# Altium PCB PCB1.PcbDoc (part 3 of 3)
Units mm, origin at the board's own origin, x right, y up, seen from the top; angles counter-clockwise.
Board outline 82.55 x 101.6 mm, 4 copper layers (Top Layer, GND, POWER, Bottom Layer), stack 1.586 mm thick; 125 components, 82 nets, 451 pads, 255 vias.
Unrouted connection lines stored in the file: 4.
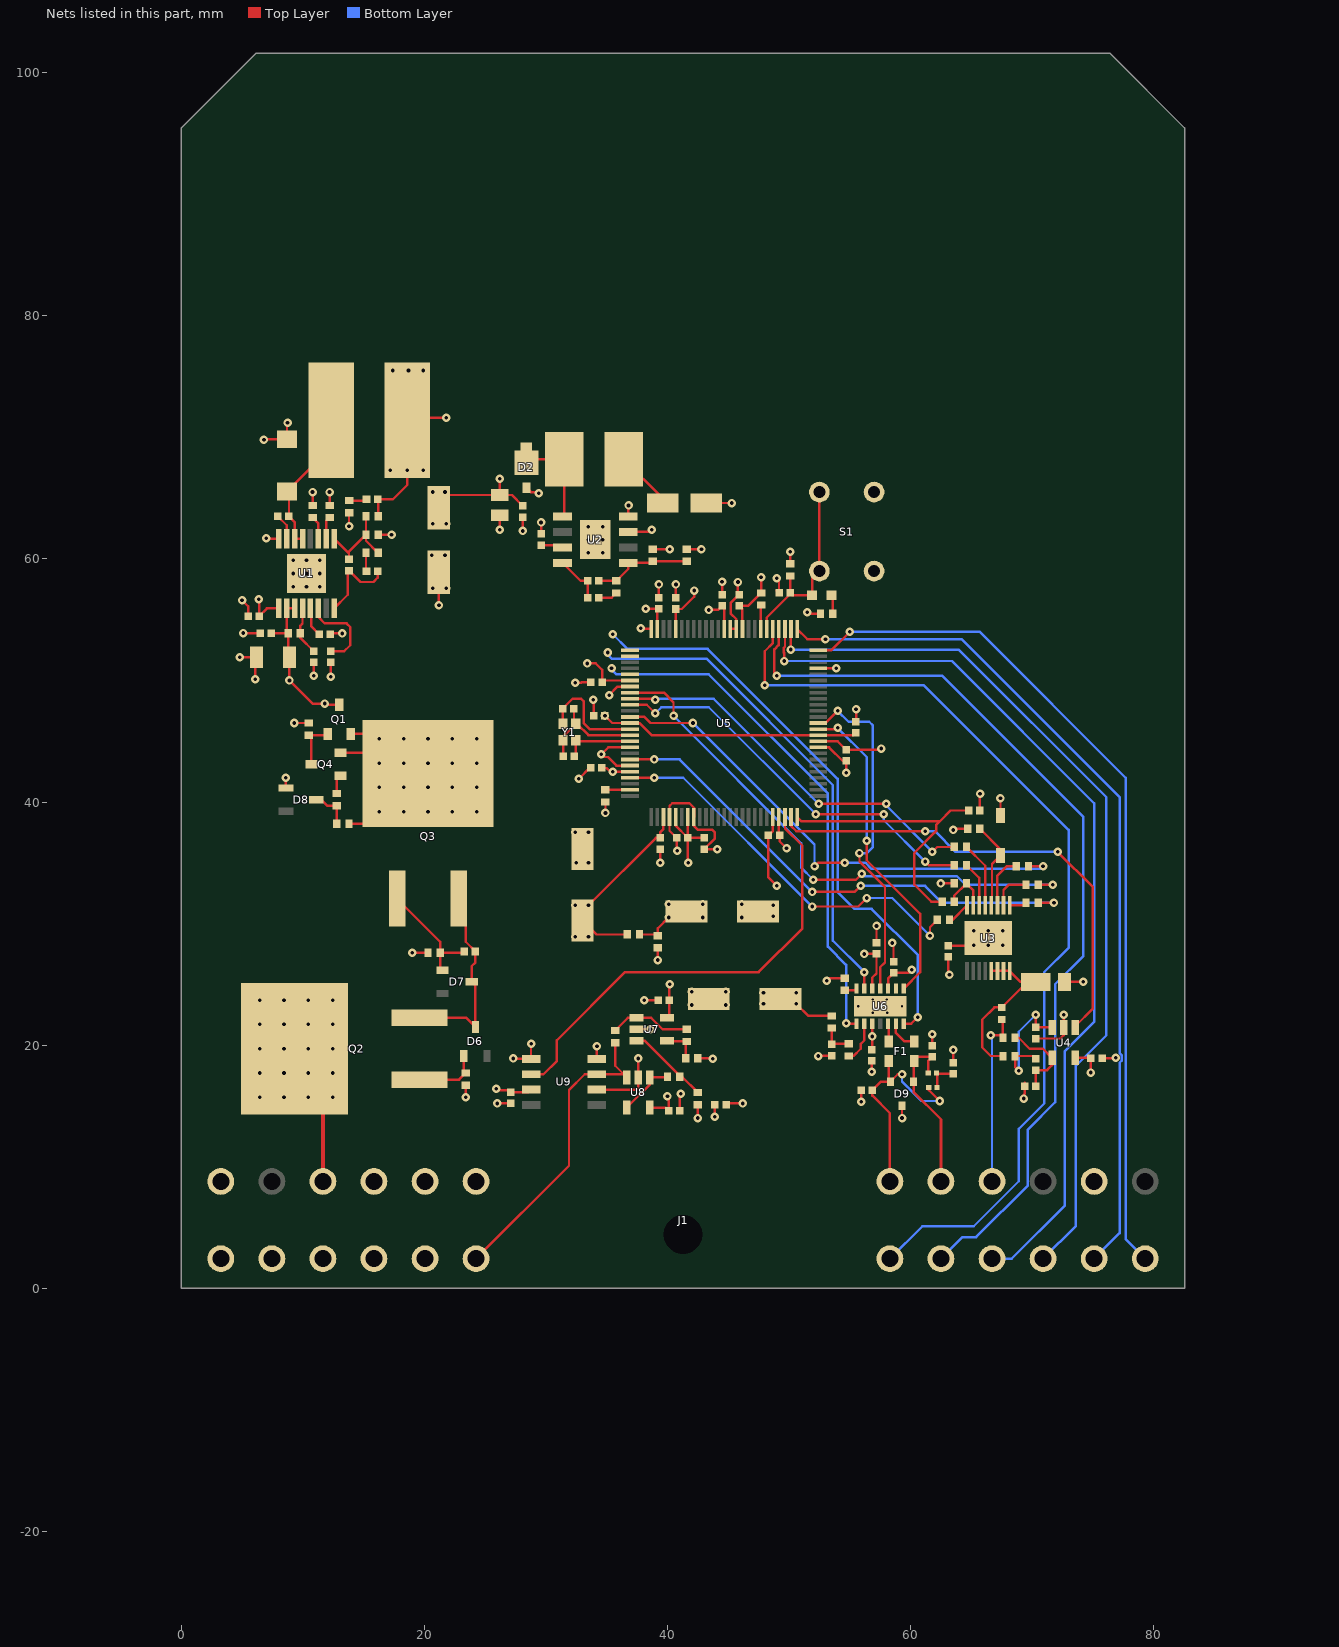
[diagram p4: the nets of this part, all layers, seen from the top]

## Part data (continued)
R31 R32: library part RK73H1HRTTCM60R4F, "Fixed Resistor, Metal Glaze/thick Film, 0.05W, 60.4ohm, 25V, 1% +/-Tol, 300ppm/Cel, Surface Mount, 0201", Manufacturer="KOA Speer", Supplier Part Number=660-RK73H1HRTTCM60R4, Category=LDO, Manufacturer Part Number=RK73H1HRTTCM60R4F, Pricing="1=0.16, 10=0.079, 50=0.079, 100=0.046, 1000=0.028, 10000=0.02 (USD)", Reach SVHC Compliant=Yes, RoHS=Yes, RoHS Compliant=Yes, Stock=38859, Supplier=Mouser
R33: library part AC0402FR-076K2L, "Fixed Resistor, Metal Glaze/thick Film, 0.0625W, 6200ohm, 50V, 1% +/-Tol, 100ppm/Cel, Surface Mount, 0402", Case/Package=0402, Manufacturer=Yageo, Max Operating Temperature=155°C, Min Operating Temperature=-55°C, Package Height=0.32mm, Package Length=1mm, Package Shape=Rectangular, Package Width=0.5mm, Power=62.5mW, Rated Temperature=70°C, Resistor Type="FIXED RESISTOR", Supplier Part Number=603-AC0402FR-076K2L, Temperature Coefficient (ppm/Cel)=100, Tolerance=1%, Working Voltage=50V, Additional Feature="LASER TRIMMABLE", Category="Chip SMD Resistors", ComponentLink1Description=https://datasheet.ciiva.com:443/pdfs/VipMasterIC/IC/YAGO/YAGO-S-A0003597364/YAGO-S-A0003597364-1.pdf?src-supplier=IHS+Markit, ComponentLink1URL=https://datasheet.ciiva.com:443/pdfs/VipMasterIC/IC/YAGO/YAGO-S-A0003597364/YAGO-S-A0003597364-1.pdf?src-supplier=IHS+Markit, ComponentLink2Description=https://datasheet.octopart.com/AC0402FR-076K2L-Yageo-datasheet-151884373.pdf?src-supplier=Future+Electronics, ComponentLink2URL=https://datasheet.octopart.com/AC0402FR-076K2L-Yageo-datasheet-151884373.pdf?src-supplier=Future+Electronics, ComponentLink3Description=http://www.yageo.com/NewPortal/yageodocoutput?fileName=/pdf/R-Chip/PYu-AC_51_RoHS_L_6.pdf&src-supplier=Digikey, ComponentLink3URL=http://www.yageo.com/NewPortal/yageodocoutput?fileName=/pdf/R-Chip/PYu-AC_51_RoHS_L_6.pdf&src-supplier=Digikey, ComponentLink4Description=https://www.yageo.com/upload/media/product/productsearch/datasheet/rchip/PYu-AC_51_RoHS_L_7.pdf?src-supplier=Digikey, ComponentLink4URL=https://www.yageo.com/upload/media/product/productsearch/datasheet/rchip/PYu-AC_51_RoHS_L_7.pdf?src-supplier=Digikey, ComponentLink5Description=http://www.yageo.com/documents/recent/PYu-AC_51_RoHS_L_2_revised.pdf?src-supplier=Future+Electronics, ComponentLink5URL=http://www.yageo.com/documents/recent/PYu-AC_51_RoHS_L_2_revised.pdf?src-supplier=Future+Electronics, Construction=Chip, JESD-609 Code=e3, Manufacturer Part Number=AC0402FR-076K2L, Mounting Technology="Surface Mount", Packaging="Tape and Reel", Pins=2, Pricing="1=0.1, 10=0.009, 50=0.009, 100=0.007, 1000=0.006, 10000=0.002 (USD)", Reach SVHC Compliant=Yes, Reference Standard=AEC-Q200, RoHS=Yes, RoHS Compliant=Yes, Stock=418682, Supplier=Mouser, Technology="METAL GLAZE/THICK FILM", Terminal Finish=Nickel, Termination=Wraparound
R34: library part RC0402JR-072KP, "Fixed Resistor, Metal Glaze/thick Film, 0.0625W, 2000ohm, 50V, 5% +/-Tol, 150ppm/Cel, Surface Mount, 0402", Manufacturer=Yageo, Supplier Part Number=603-RC0402JR-072KP, Category=Uncategorized, Manufacturer Part Number=RC0402JR-072KP, Pricing="1=0.2, 10=0.02, 50=0.02, 100=0.013, 1000=0.011, 10000=0.005 (USD)", RoHS=Yes, Stock=28128, Supplier=Mouser
R36 R37: library part AC0402FR-1010RL, "Fixed Resistor, Metal Glaze/thick Film, 0.0625W, 10ohm, 50V, 1% +/-Tol, 200ppm/Cel, Surface Mount, 0402", Case/Package=0402, Manufacturer=Yageo, Max Operating Temperature=155°C, Min Operating Temperature=-55°C, Package Height=0.32mm, Package Length=1mm, Package Shape=Rectangular, Package Width=0.5mm, Power=62.5mW, Rated Temperature=70°C, Resistor Type="FIXED RESISTOR", Supplier Part Number=603-AC0402FR-1010RL, Temperature Coefficient (ppm/Cel)=200, Tolerance=1%, Working Voltage=50V, Additional Feature="LASER TRIMMABLE", Category="Chip SMD Resistors", ComponentLink1Description=https://datasheet.ciiva.com:443/pdfs/VipMasterIC/IC/YAGO/YAGO-S-A0003597364/YAGO-S-A0003597364-1.pdf?src-supplier=IHS+Markit, ComponentLink1URL=https://datasheet.ciiva.com:443/pdfs/VipMasterIC/IC/YAGO/YAGO-S-A0003597364/YAGO-S-A0003597364-1.pdf?src-supplier=IHS+Markit, Construction=Chip, JESD-609 Code=e3, Manufacturer Part Number=AC0402FR-1010RL, Mounting Technology="Surface Mount", Packaging="Tape and Reel", Pins=2, Pricing="1=0.18, 10=0.018, 50=0.018, 100=0.012, 1000=0.01, 10000=0.005 (USD)", Reach SVHC Compliant=Yes, Reference Standard=AEC-Q200, RoHS=Yes, RoHS Compliant=Yes, Stock=136743, Supplier=Mouser, Technology="METAL GLAZE/THICK FILM", Terminal Finish=Nickel, Termination=Wraparound
S1: "BUTON MINI 6X6X5, 4 PINI", Price="0.36 RON", Supplier=Sigmanortec
U1: library part A7987TR, "Switching Regulator, Voltage-mode, 4.4A, 1650kHz Switching Freq-Max, PDSO16", Manufacturer=STMicroelectronics, Supplier Part Number=511-A7987TR, Category="Voltage Regulators - Switching", ComponentLink1Description=https://www.st.com/resource/en/datasheet/a7987.pdf?src-supplier=Digikey, ComponentLink1URL=https://www.st.com/resource/en/datasheet/a7987.pdf?src-supplier=Digikey, ComponentLink2Description=https://datasheet.octopart.com/A7987TR-STMicroelectronics-datasheet-153441496.pdf?src-supplier=Element14, ComponentLink2URL=https://datasheet.octopart.com/A7987TR-STMicroelectronics-datasheet-153441496.pdf?src-supplier=Element14, Manufacturer Part Number=A7987TR, Pricing="1=5.04, 10=3.84, 50=3.54, 100=3.21, 1000=2.88, 10000=2.58 (USD)", RoHS=Yes, RoHS Compliant=Yes, Stock=4709, Supplier=Mouser
U2: library part A7985ATR, "Switching Regulator, Voltage-mode, 3.5A, 275kHz Switching Freq-Max, PDSO8", Case/Package=HLSOP, Frequency=275kHz, Manufacturer=STMicroelectronics, Max Operating Temperature=125°C, Max Output current=3.5A, Max Supply Voltage=38V, Min Input Voltage=4.5V, Min Operating Temperature=-40°C, Nominal Supply Voltage=12V, Package Body Material=Plastic, Package Equivalence Code=SOP8,.25, Package Shape=Rectangular, Package Style="SMALL OUTLINE, HEAT SINK/SLUG, LOW PROFILEMeter", Supplier Part Number=511-A7985ATR, Temperature Grade=AUTOMOTIVE, Category="Voltage Regulators - Switching", Channels=1, ComponentLink1Description=https://datasheet.ciiva.com:443/pdfs/VipMasterIC/IC/SGST/SGST-S-A0002908266/SGST-S-A0002908266-1.pdf?src-supplier=IHS+Markit, ComponentLink1URL=https://datasheet.ciiva.com:443/pdfs/VipMasterIC/IC/SGST/SGST-S-A0002908266/SGST-S-A0002908266-1.pdf?src-supplier=IHS+Markit, ComponentLink2Description=https://datasheet.ciiva.com/41458/001184805-da-01-en-ic-reg-buck-adj-2a-a7985atr-soic-8-stm-41458161.pdf?src-supplier=Conrad, ComponentLink2URL=https://datasheet.ciiva.com/41458/001184805-da-01-en-ic-reg-buck-adj-2a-a7985atr-soic-8-stm-41458161.pdf?src-supplier=Conrad, ComponentLink3Description=https://datasheet.ciiva.com/6603/dm00053375-6603398.pdf?src-supplier=Digikey, ComponentLink3URL=https://datasheet.ciiva.com/6603/dm00053375-6603398.pdf?src-supplier=Digikey, ComponentLink4Description=https://datasheet.ciiva.com/6603/dm00053375-6603399.pdf?src-supplier=Digikey, ComponentLink4URL=https://datasheet.ciiva.com/6603/dm00053375-6603399.pdf?src-supplier=Digikey, ComponentLink5Description=https://datasheet.ciiva.com/6603/dm00053375-6603401.pdf?src-supplier=Digikey, ComponentLink5URL=https://datasheet.ciiva.com/6603/dm00053375-6603401.pdf?src-supplier=Digikey, Control Mode=VOLTAGE-MODE, Control Technique="PULSE WIDTH MODULATION", Height - Seated (Max)=1.7mm, JESD-30 Code=R-PDSO-G8, JESD-609 Code=e3, Length=4.9mm, Manufacturer Part Number=A7985ATR, Moisture Sensitivity Level=3, Pins=8, Pricing="1=1.76, 10=1.51, 50=1.42, 100=1.34, 1000=1.24, 10000=1.1 (USD)", Qualification Status="Not Qualified", Reach SVHC Compliant=Yes, RoHS=Yes, RoHS Compliant=Yes, Stock=5225, Supplier=Mouser, Surface Mount=Yes, Switcher Configuration=BUCK, Terminal Finish=Tin, Terminal Form="Gull Wing", Terminal Pitch=1.27mm, Terminal Position=DUAL, Throw Configuration="SWITCHING REGULATOR", Width=3.9mm
U3: library part VND7020AJTR, "Buffer/Inverter Based Peripheral Driver, PDSO16", Case/Package=HLSSOP, Manufacturer=STMicroelectronics, Max Operating Temperature=125°C, Max Supply Voltage=28V, Min Operating Temperature=-40°C, Min Supply Voltage=4V, Nominal Supply Voltage=13V, Output Current Flow Direction=SINK, Package Body Material=Plastic, Package Shape=Rectangular, Package Style="SMALL OUTLINE, HEAT SINK/SLUG, LOW PROFILE, SHRINK PITCHMeter", Supplier Part Number=511-VND7020AJTR, Temperature Grade=AUTOMOTIVE, Built-in Protections="Over Current,Over Voltage,Under Voltage,TRANSIENT,THERMAL", Category="Power Management ICs", Channels=1, ComponentLink1Description=https://datasheet.ciiva.com:443/pdfs/VipMasterIC/IC/SGST/SGST-S-A0003587758/SGST-S-A0003587758-1.pdf?src-supplier=IHS+Markit, ComponentLink1URL=https://datasheet.ciiva.com:443/pdfs/VipMasterIC/IC/SGST/SGST-S-A0003587758/SGST-S-A0003587758-1.pdf?src-supplier=IHS+Markit, ComponentLink2Description=http://www.st.com/content/ccc/resource/technical/document/datasheet/53/f9/e8/69/7d/b8/4a/10/DM00157075.pdf/files/DM00157075.pdf/jcr:content/translations/en.DM00157075.pdf?src-supplier=Digikey, ComponentLink2URL=http://www.st.com/content/ccc/resource/technical/document/datasheet/53/f9/e8/69/7d/b8/4a/10/DM00157075.pdf/files/DM00157075.pdf/jcr:content/translations/en.DM00157075.pdf?src-supplier=Digikey, ComponentLink3Description=http://www.st.com/st-web-ui/static/active/en/resource/technical/document/datasheet/DM00157075.pdf?src-supplier=Avnet, ComponentLink3URL=http://www.st.com/st-web-ui/static/active/en/resource/technical/document/datasheet/DM00157075.pdf?src-supplier=Avnet, ComponentLink4Description=https://datasheet.octopart.com/VND7020AJTR-STMicroelectronics-datasheet-42731139.pdf?src-supplier=Future+Electronics, ComponentLink4URL=https://datasheet.octopart.com/VND7020AJTR-STMicroelectronics-datasheet-42731139.pdf?src-supplier=Future+Electronics, ComponentLink5Description=https://datasheet.octopart.com/VND7020AJTR-STMicroelectronics-datasheet-158447462.pdf?src-supplier=SHENGYU+ELECTRONICS, ComponentLink5URL=https://datasheet.octopart.com/VND7020AJTR-STMicroelectronics-datasheet-158447462.pdf?src-supplier=SHENGYU+ELECTRONICS, ComponentLink6Description=https://datasheet.octopart.com/VND7020AJTR-STMicroelectronics-datasheet-140368810.pdf?src-supplier=TME, ComponentLink6URL=https://datasheet.octopart.com/VND7020AJTR-STMicroelectronics-datasheet-140368810.pdf?src-supplier=TME, Height - Seated (Max)=1.7mm, Interface IC Type="BUFFER OR INVERTER BASED PERIPHERAL DRIVER", JESD-30 Code=R-PDSO-G16, Length=4.9mm, Manufacturer Part Number=VND7020AJTR, Pins=16, Pricing="1=2.79, 10=2.05, 50=1.93, 100=1.77, 1000=1.53, 10000=1.41 (USD)", Reach SVHC Compliant=Yes, RoHS=Yes, RoHS Compliant=Yes, Stock=132353, Supplier=Mouser, Surface Mount=Yes, Terminal Form="Gull Wing", Terminal Pitch=0.5mm, Terminal Position=DUAL, Turn-Off Delay Time=100us, Turn-On Delay Time=120us, Width=3.9mm
U4: library part INA193AQDBVRQ1, "Operational Amplifier, 1 Func, PDSO5", Case/Package=LSSOP, Manufacturer="Texas Instruments", Max Operating Temperature=125°C, Max Supply Voltage=18V, Min Operating Temperature=-40°C, Min Supply Voltage=2.7V, Nominal Supply Voltage=12V, Package Body Material=Plastic, Package Equivalence Code=TSOP5/6,.11,37, Package Shape=Rectangular, Package Style="SMALL OUTLINE, LOW PROFILE, SHRINK PITCHMeter", Peak Reflow Temperature (Cel)=260°C, Supplier Part Number=595-INA193AQDBVRQ1, Supply Current-Max (Isup)=1.25mA, Temperature Grade=AUTOMOTIVE, Adjustable Threshold=No, Category="Amplifiers - Op Amps, Buffer, Instrumentation", Channels=1, ComponentLink1Description=https://www.ti.com:443/lit/ds/symlink/ina193a-q1.pdf?src-supplier=IHS+Markit, ComponentLink1URL=https://www.ti.com:443/lit/ds/symlink/ina193a-q1.pdf?src-supplier=IHS+Markit, ComponentLink2Description=https://datasheet.ciiva.com/1939/ina193a-q1-1939597.pdf?src-supplier=Digikey, ComponentLink2URL=https://datasheet.ciiva.com/1939/ina193a-q1-1939597.pdf?src-supplier=Digikey, ComponentLink3Description=https://datasheet.ciiva.com/1577/1383809-1577443.pdf?src-supplier=Newark, ComponentLink3URL=https://datasheet.ciiva.com/1577/1383809-1577443.pdf?src-supplier=Newark, ComponentLink4Description=https://datasheet.ciiva.com/4875/sbos366c-126160-4875330.pdf?src-supplier=Mouser, ComponentLink4URL=https://datasheet.ciiva.com/4875/sbos366c-126160-4875330.pdf?src-supplier=Mouser, ComponentLink5Description=https://datasheet.ciiva.com/15134/getdatasheetpartid-255678-15134586.pdf?src-supplier=Verical, ComponentLink5URL=https://datasheet.ciiva.com/15134/getdatasheetpartid-255678-15134586.pdf?src-supplier=Verical, ComponentLink6Description=https://datasheet.ciiva.com/2977/ina198a-q1-2977933.pdf?src-supplier=Avnet, ComponentLink6URL=https://datasheet.ciiva.com/2977/ina198a-q1-2977933.pdf?src-supplier=Avnet, ComponentLink7Description=https://datasheet.ciiva.com/2977/ina198a-q1-2977934.pdf?src-supplier=Avnet, ComponentLink7URL=https://datasheet.ciiva.com/2977/ina198a-q1-2977934.pdf?src-supplier=Avnet, Height - Seated (Max)=1.45mm, JESD-30 Code=R-PDSO-G5, JESD-609 Code=e4, Length=2.9mm, Manufacturer Part Number=INA193AQDBVRQ1, Moisture Sensitivity Level=2, Number of Channels=1, Pins=5, Power Supplies=12V, Pricing="1=4.07, 10=3.08, 50=2.83, 100=2.56, 1000=2.29, 10000=2.18 (USD)", Qualification Status="Not Qualified", Reach SVHC Compliant=Yes, RoHS=Yes, RoHS Compliant=Yes, Stock=19974, Supplier=Mouser, Surface Mount=Yes, Terminal Finish=Nickel, Terminal Form="Gull Wing", Terminal Pitch=0.95mm, Terminal Position=DUAL, Throw Configuration="POWER SUPPLY SUPPORT CIRCUIT", Width=1.6mm
U5: library part TMS5700332BPZQQ1, "RISC Microcontroller, 32-Bit, FLASH, CORTEX-R4F CPU, 80MHz, CMOS, PQFP100", Manufacturer="Texas Instruments", Supplier Part Number=595-TMS5700332BPZQQ1, Category=Microcontrollers, ComponentLink1Description=https://www.ti.com:443/lit/ds/symlink/tms570ls0332.pdf?src-supplier=IHS+Markit, ComponentLink1URL=https://www.ti.com:443/lit/ds/symlink/tms570ls0332.pdf?src-supplier=IHS+Markit, ComponentLink2Description=https://www.ti.com/lit/ds/symlink/tms570ls0332.pdf?src-supplier=Digikey, ComponentLink2URL=https://www.ti.com/lit/ds/symlink/tms570ls0332.pdf?src-supplier=Digikey, ComponentLink3Description=http://www.ti.com/lit/gpn/tms570ls0332?src-supplier=Mouser, ComponentLink3URL=http://www.ti.com/lit/gpn/tms570ls0332?src-supplier=Mouser, ComponentLink4Description=http://www.ti.com/general/docs/lit/getliterature.tsp?genericPartNumber=TMS570LS0332&&fileType=pdf&src-supplier=Avnet, ComponentLink4URL=http://www.ti.com/general/docs/lit/getliterature.tsp?genericPartNumber=TMS570LS0332&&fileType=pdf&src-supplier=Avnet, JESD-609 Code=e4, Manufacturer Part Number=TMS5700332BPZQQ1, Moisture Sensitivity Level=3, Pricing="1=12.28, 10=9.98, 50=9.52, 100=8.26, 1000=7.2, 10000=6.27 (USD)", Reach SVHC Compliant=Yes, RoHS=Yes, RoHS Compliant=Yes, Stock=411, Supplier=Mouser, Technology=CMOS, Terminal Finish=Nickel
U6: library part TCAN1043DMTRQ1, "Ethernet Transceiver, 1-Trnsvr, PDSO14", Manufacturer="Texas Instruments", Supplier Part Number=595-TCAN1043DMTRQ1, Category="Interface ICs", ComponentLink1Description=https://www.ti.com:443/lit/ds/symlink/tcan1043-q1.pdf?src-supplier=IHS+Markit, ComponentLink1URL=https://www.ti.com:443/lit/ds/symlink/tcan1043-q1.pdf?src-supplier=IHS+Markit, ComponentLink2Description=http://www.ti.com/lit/ds/symlink/tcan1043-q1.pdf?src-supplier=Digikey, ComponentLink2URL=http://www.ti.com/lit/ds/symlink/tcan1043-q1.pdf?src-supplier=Digikey, JESD-609 Code=e3, Manufacturer Part Number=TCAN1043DMTRQ1, Moisture Sensitivity Level=2, Pricing="1=2.47, 10=1.84, 50=1.68, 100=1.51, 1000=1.33, 10000=1.16 (USD)", Reach SVHC Compliant=Yes, RoHS=Yes, RoHS Compliant=Yes, Stock=28707, Supplier=Mouser, Telecom IC Type="ETHERNET TRANSCEIVER", Terminal Finish=Tin
U7 U8: library part AD8538AUJZ-REEL7, "Operational Amplifier, 1 Func, 30uV Offset-Max, CMOS, PDSO5", Average Bias Current-Max (IIB)=100pA, Bias Current-Max (IIB) @25C=25pA, Case/Package=VSSOP, Frequency Compensation=YES, Input Offset Voltage-Max=30uV, Manufacturer="Analog Devices", Max Operating Temperature=125°C, Max Supply Current=215uA, Micropower=Yes, Min Operating Temperature=-40°C, Neg Supply Voltage Limit-Max=0V, Nominal Supply Voltage=5V, Package Body Material=Plastic, Package Equivalence Code=TSOP5/6,.11,37, Package Shape=Rectangular, Package Style="SMALL OUTLINE, VERY THIN PROFILE, SHRINK PITCHMeter", Peak Reflow Temperature (Cel)=260°C, Power=No, Power Supplies=+-1.35/+-2.5/2.7/5V, Supplier Part Number=584-AD8538AUJZ-R7, Supply Voltage Limit-Max=6V, Temperature Grade=AUTOMOTIVE, Time @ Peak Reflow Temperature-Max (s)=40s, Voltage Gain-Min=178000, Amplifier Type="OPERATIONAL AMPLIFIER", Architecture=VOLTAGE-FEEDBACK, Category="Amplifiers - Op Amps, Buffer, Instrumentation", Channels=1, Common-mode Reject Ratio-Nom=135dB, ComponentLink1Description=https://datasheet.ciiva.com:443/pdfs/VipMasterIC/IC/ANDI/ANDIS13894/ANDIS13894-1.pdf?src-supplier=IHS+Markit, ComponentLink1URL=https://datasheet.ciiva.com:443/pdfs/VipMasterIC/IC/ANDI/ANDIS13894/ANDIS13894-1.pdf?src-supplier=IHS+Markit, ComponentLink2Description=https://datasheet.ciiva.com/15374/ad8538-8539-243268-15374656.pdf?src-supplier=Mouser, ComponentLink2URL=https://datasheet.ciiva.com/15374/ad8538-8539-243268-15374656.pdf?src-supplier=Mouser, ComponentLink3Description=https://datasheet.ciiva.com/2974/ad8538-8539-2974672.pdf?src-supplier=Avnet, ComponentLink3URL=https://datasheet.ciiva.com/2974/ad8538-8539-2974672.pdf?src-supplier=Avnet, ComponentLink4Description=https://datasheet.ciiva.com/1793/ad8538-8539-1793940.pdf?src-supplier=Digikey, ComponentLink4URL=https://datasheet.ciiva.com/1793/ad8538-8539-1793940.pdf?src-supplier=Digikey, ComponentLink5Description=https://datasheet.ciiva.com/1793/ad8538-8539-1793941.pdf?src-supplier=Digikey, ComponentLink5URL=https://datasheet.ciiva.com/1793/ad8538-8539-1793941.pdf?src-supplier=Digikey, ComponentLink6Description=https://datasheet.ciiva.com/1793/ad8538-8539-1793942.pdf?src-supplier=Digikey, ComponentLink6URL=https://datasheet.ciiva.com/1793/ad8538-8539-1793942.pdf?src-supplier=Digikey, ComponentLink7Description=https://datasheet.ciiva.com/2973/ad8538-8539-2973062.pdf?src-supplier=Avnet, ComponentLink7URL=https://datasheet.ciiva.com/2973/ad8538-8539-2973062.pdf?src-supplier=Avnet, Height - Seated (Max)=1mm, JESD-30 Code=R-PDSO-G5, JESD-609 Code=e3, Length=2.9mm, Low-Bias=Yes, Low-Offset=Yes, Manufacturer Part Number=AD8538AUJZ-REEL7, Moisture Sensitivity Level=1, Neg Supply Voltage-Nom (Vsup)=0V, Packaging="Tape and Reel", Pins=5, Pricing="1=1.65, 10=1.42, 50=1.42, 100=1.25, 1000=0.916, 10000=0.84 (USD)", Programmable Power=No, Qualification Status="Not Qualified", Reach SVHC Compliant=Yes, RoHS=Yes, RoHS Compliant=Yes, Slew Rate=0.4V/µs, Stock=130448, Supplier=Mouser, Surface Mount=Yes, Technology=CMOS, Terminal Finish=Tin, Terminal Form="Gull Wing", Terminal Pitch=0.95mm, Terminal Position=DUAL, Unity Gain BW-Nom=430kHz, Wideband=No, Width=1.6mm
U9: library part MAX4194ESA+, "Instrumentation Amplifier, 1 Func, 690uV Offset-Max, 0.25MHz Band Width, PDSO8", Average Bias Current-Max (IIB)=20nA, Case/Package=SOP, Input Offset Current-Max (IIO)=3nA, Input Offset Voltage-Max=690uV, Manufacturer=Maxim, Max Operating Temperature=85°C, Max Supply Current=110uA, Min Operating Temperature=-40°C, Nominal Supply Voltage=5V, Package Body Material=Plastic, Package Equivalence Code=SOP8,.25, Package Shape=Rectangular, Package Style="SMALL OUTLINEMeter", Peak Reflow Temperature (Cel)=260°C, Power Supplies=+-1.35/+-3.75/2.7/7.5V, Supplier Part Number=700-MAX4194ESA, Supply Voltage Limit-Max=8V, Temperature Grade=INDUSTRIAL, Time @ Peak Reflow Temperature-Max (s)=30s, Voltage Gain-Max=10000, Voltage Gain-Min=1, Amplifier Type="INSTRUMENTATION AMPLIFIER", Bandwidth (3dB)-Nom=250kHz, Category="Amplifiers - Op Amps, Buffer, Instrumentation", Channels=1, Common Mode Rejection Ratio-Min=73dB, ComponentLink1Description=https://datasheet.ciiva.com:443/pdfs/VipMasterIC/IC/MAXM/MAXMS15090/MAXMS15090-1.pdf?src-supplier=IHS+Markit, ComponentLink1URL=https://datasheet.ciiva.com:443/pdfs/VipMasterIC/IC/MAXM/MAXMS15090/MAXMS15090-1.pdf?src-supplier=IHS+Markit, ComponentLink2Description=https://datasheet.ciiva.com/2975/max4194-max4197-2975858.pdf?src-supplier=Avnet, ComponentLink2URL=https://datasheet.ciiva.com/2975/max4194-max4197-2975858.pdf?src-supplier=Avnet, ComponentLink3Description=https://datasheet.ciiva.com/14338/max4194-max4197-14338475.pdf?src-supplier=Avnet, ComponentLink3URL=https://datasheet.ciiva.com/14338/max4194-max4197-14338475.pdf?src-supplier=Avnet, ComponentLink4Description=https://datasheet.ciiva.com/1802/max4194-max4197-1802609.pdf?src-supplier=Digikey, ComponentLink4URL=https://datasheet.ciiva.com/1802/max4194-max4197-1802609.pdf?src-supplier=Digikey, ComponentLink5Description=https://datasheet.ciiva.com/1819/max4194-max4197-1819822.pdf?src-supplier=Digikey, ComponentLink5URL=https://datasheet.ciiva.com/1819/max4194-max4197-1819822.pdf?src-supplier=Digikey, Height - Seated (Max)=1.75mm, JESD-30 Code=R-PDSO-G8, JESD-609 Code=e3, Length=4.9mm, Manufacturer Part Number=MAX4194ESA+, Moisture Sensitivity Level=1, Pins=8, Pricing="1=7.06, 10=5.31, 50=5.17, 100=4.65, 1000=3.83, 10000=3.83 (USD)", Qualification Status="Not Qualified", Reach SVHC Compliant=Yes, RoHS=Yes, RoHS Compliant=Yes, Slew Rate=0.06V/µs, Stock=2146, Supplier=Mouser, Surface Mount=Yes, Terminal Finish=Tin, Terminal Form="Gull Wing", Terminal Pitch=1.27mm, Terminal Position=DUAL, Width=3.9mm
Y1: library part ECS-160-10-37B2-CTN-TR, "Crystal 16MHz 10pF 4-Pin SMD ECX-1637B2 T/R", Manufacturer="ECS International", Supplier Part Number=520-160-10-37B2CTNTR, ComponentLink1Description=https://datasheet.octopart.com/ECS-160-10-37B2-CTN-TR-ECS-International-datasheet-163707945.pdf?src-supplier=Master+Electronics, ComponentLink1URL=https://datasheet.octopart.com/ECS-160-10-37B2-CTN-TR-ECS-International-datasheet-163707945.pdf?src-supplier=Master+Electronics, Manufacturer Part Number=ECS-160-10-37B2-CTN-TR, Pricing="1=0.28, 10=0.238, 50=0.238, 100=0.232, 1000=0.213, 10000=0.169 (USD)", RoHS=No, Stock=8732, Supplier=Mouser

## Via types
v1: diameter 0.7, hole 0.3, Top Layer to Bottom Layer, tented top, 188 vias
v2: diameter 0.7, hole 0.3, Top Layer to Bottom Layer, 61 vias
v3: diameter 0.5, hole 0.2, Top Layer to Bottom Layer, 6 vias

## Nets (pads, with @x,y where several pads share a name; then routed paths per layer and width w, separated by ;. In a path a pad name is that pad's centre, name@x,y a point inside that pad or via, vN(x,y) a via of type N, cw(c..) or ccw(c..) an arc to the next point about the centre after c; other vN are vias at no path point)
1V2: C22.2 C23.2 C27.1 C30.2 C31.2 C33.2 C44.2 C47.2 R25.1 R26.2 U5.13 U5.21 U5.30 U5.32 U5.61 U5.88 U5.99 | length 40.7
  Top Layer w0.2: C33.2@34.6,42.8 35,42.8 35.301,42.499 35.499,42.499 v1(35.5,42.5) 35.501,42.499 U5.21@36.932,42.499 ; v1(34.86,47.1) 35.461,46.499 U5.13@36.932,46.499 37.701,46.499 38.701,45.499 U5.61@52.408,45.499 55.299,45.499 C31.2@55.5,45.7 ; R25.1@37.7,29.1 39.1,29.1 R26.2@39.2,29 39.2,29.6 v1(40.1,30.5) ; v1(38.2,55.9) C23.2@39.3,55.9 39.17,55.77 U5.99@39.17,54.237 ; U5.30@40.67,38.761 40.67,38.056 C44.2@41.67,37.056 ; U5.32@41.67,38.761 C44.2@41.67,37.056 ; v1@41.681,34.8 C44.2@41.681,37.045 ; C47.2@43.028,37.045 C44.2@41.681,37.045 ; v1(43.4,55.8) 44.16,55.8 C22.2@44.5,56.14 44.67,55.97 U5.88@44.67,54.237 ; C44.2@41.67,37.056 C44.2@41.681,37.045
  other v1: 42.9,30.5 40.1,31.6 42.9,31.6 41.7,35
3V3: C21.2 C24.2 C25.1 C26.2 C29.2 C32.2 C37.2 C40.2 C41.2 C49.2 C50.2 C51.2 C52.2 R8.2 R23.2 R24.2 R25.2 R27.2 R40.2 U4.5 U5.6 U5.28 U5.46 U5.60 U5.85 U5.96 U6.5 U7.5 U8.5 U9.7 | length 62.4
  Top Layer w0.2: v1(25.9,16.4) 26,16.3 26.92,16.3 C52.2@27.1,16.12 28.566,16.12 U9.7@28.776,16.33 ; v1(33.4,51.4) 34.1,51.4 34.62,50.88 C29.2@34.62,49.846 34.773,49.999 U5.6@36.932,49.999 ; v1(33.5,31.5) 39.045,37.045 C40.2@39.395,37.045 39.395,37.495 39.67,37.77 U5.28@39.67,38.761 ; C25.1@33.675,31.325 33,30.649 C25.1@33,30.25 34.15,29.1 R25.2@36.7,29.1 ; U8.5@38.55,14.85 39.85,14.85 C51.2@40.1,14.6 40.1,15.7 v1(40,15.8) ; R8.2@38.8,60.8 v1(40.2,60.8) ; U7.5@39.95,22.25 40.16,22.46 C49.2@40.16,23.7 40.16,24.96 v1(40.2,25) ; U5.96@40.67,54.237 40.67,55.85 C26.2@40.7,55.88 41.18,55.88 42.2,56.9 v1(42.2,57.4) ; v1(42.5,14) R40.2@42.5,15.1 ; v1(43.9,14.1) C50.2@43.9,15.1 ; U5.85@46.17,54.237 46.17,55.87 C24.2@45.9,56.14 46.64,56.14 R27.2@47.7,57.2 v1(47.7,58.5) ; U5.46@48.67,38.761 48.67,37.612 C41.2@48.305,37.248 48.305,33.795 v1(49,33.1) ; R24.2@50.1,59.6 v1(50.1,60.6) ; v1@51.6,55.5 R23.2@52.6,55.5 ; U5.60@52.408,44.999 54.001,44.999 C32.2@54.7,44.3 57.5,44.3 v1(57.6,44.4) ; v1(56.2,27.5) C37.2@57.2,27.5 57.2,25.9 56.85,25.55 U6.5@56.85,24.65 ; U4.5@73.55,18.95 74.79,18.95 C21.2@74.84,18.9 v1(74.84,17.74)
  other v1: 32.4,28.9 33.5,28.9 32.4,31.5 51.5,55.6
5V: C1.1 C6.1 C7.2 C11.1 C12.2 C46.2 L1.2 R2.2 U1.1 U2.8 U6.3 | length 29.9
  Top Layer w0.2: v1@6.42,56.68 C6.1@6.42,55.3 7.045,55.925 U1.1@8.025,55.925 ; R2.2@16.2,63.5 16.2,64.86 C7.2@16.16,64.9 17.4,64.9 18.6,66.1 L1.2@18.6,71.4 18.8,71.6 v1(21.8,71.6) ; v1(20.7,65.5) 21.2,65 C1.1@21.2,64.2 ; v1(21.7,65.5) 21.94,65.26 C12.2@26.2,65.26 ; v1(26.2,66.6) C12.2@26.2,65.26 ; C11.1@28.1,64.36 27.2,65.26 C12.2@26.2,65.26 ; U2.8@36.789,63.49 36.789,64.389 v1(36.8,64.4) ; U6.3@58.15,24.65 58.15,25.49 C46.2@58.6,25.94 59.84,25.94 v1(60.1,26.2)
  other v1: 6.383,56.695 20.7,62.9 21.8,62.9 17.2,67.3 18.6,67.3 19.9,67.3 17.4,75.5 18.7,75.5 19.9,75.5
12V: C3.2 C4.2 C16.2 C34.2 C39.1 Q1.3 R1.2 R28.2 U1.2 U1.3 U3.17 U6.10 | length 20.5
  Top Layer w0.2: C4.2@7.4,53.9 R1.2@8.8,53.9 ; U1.3@9.325,55.925 U1.2@8.675,55.925 8.675,54.025 R1.2@8.8,53.9 ; Q1.3@13,48 11.9,48 v1(11.8,48.1) 10.8,48.1 v1(8.9,50) C3.2@8.9,51.9 8.8,52 R1.2@8.8,53.9 ; v1(50.6,23.4) 51.6,22.4 R28.2@53.5,22.4 ; C34.2@56.8,19.62 56.85,19.67 U6.10@56.85,21.75 ; C16.2@63.119,28.19 65.19,28.19 v2(65.2,28.2)
  other v1: 56.85,20.71 47.9,23.4 47.9,24.3 50.6,24.3
  other v2: 66.4,28.2 67.6,28.2 65.2,29.4 66.4,29.4 67.6,29.4
ADCIN0: C17.2 R17.1 U5.50 | length 23.6
  Top Layer w0.2: U5.50@50.67,38.761 51.031,38.4 62.4,38.4 ; R17.1@62.6,31.8 61.7,31.8 60.3,33.2 60.3,35.8 62.1,37.6 62.1,38.1 62.4,38.4 ; C17.2@64.78,39.3 63.3,39.3 62.4,38.4
ADCIN1: U4.1 U5.49 | length 39.8
  Top Layer w0.2: U5.49@50.17,38.761 50.17,38.442 50.17,38.03 50.6,37.6 50.9,37.6 v1(61.2,37.6) ; v1(72.1,35.9) 75,33 75,23 73.55,21.55 U4.1@73.55,21.45
  Bottom Layer w0.2: v1(61.2,37.6) 62,37.6 63.7,35.9 v1(72.1,35.9)
ADCIN9: U5.48 U9.6 | length 38
  Top Layer w0.2: U9.6@28.776,17.6 29.8,17.6 30.9,18.7 30.9,20.4 36.5,26 47.5,26 51.1,29.6 51.1,36.4 49.67,37.83 U5.48@49.67,38.761
CAN_N: C53.1 D9.1 F1.3 J1.B1 R32.1 | length 18.7
  Top Layer w0.2: F1.3@58.2,18.7 58.2,17.15 D9.1@58.35,17 ; J1.B1@58.305,8.78 58.305,14.395 56.86,15.84 C53.1@56.86,16.3 57.56,17 D9.1@58.35,17 ; v1(59.3,17.6) 58.95,17.6 D9.1@58.35,17 ; R32.1@61.5,16.5 61.5,16.3 v1(62.4,15.4)
  Bottom Layer w0.2: v1(59.3,17.6) 59.3,17 60.9,15.4 v1(62.4,15.4)
CAN_P: C54.2 D9.2 F1.2 J1.B2 R31.2 | length 14
  Top Layer w0.2: R31.2@61.46,17.7 61.46,18.7 C54.2@61.8,19.04 60.64,19.04 F1.2@60.3,18.7 60.25,18.65 D9.2@60.25,17 60.25,16.15 62.505,13.895
  Top Layer w0.25: J1.B2@62.505,8.78 62.505,13.895
EN: U5.2 U6.6 | length 41
  Top Layer w0.2: U6.6@56.2,24.65 v1(56.2,26)
  Bottom Layer w0.2: v1(35.1,52.3) 35.1,52.1 35.4,51.8 43.2,51.8 53.6,41.4 53.6,28.6 v1(56.2,26)
F\A\U\L\T\: R11.1 U5.8 | length 44.7
  Top Layer w0.2: U5.8@36.932,48.999 39.701,48.999 40.5,48.2 v1(40.5,47.1) ; v1(52,33.6) 55.5,33.6 v1(56,34.1) ; R11.1@70.5,33.2 v1(71.7,33.2)
  Bottom Layer w0.2: v1(40.5,47.1) 51,36.6 51,34.6 v1(52,33.6) ; v1(56,34.1) 56.2,33.9 63.8,33.9 64.5,33.2 v1(71.7,33.2)
GND: C1.2 C3.1 C4.1 C5.1 C6.2 C10.1 C11.2 C12.1 C13.2 C16.1 C17.1 C18.1 C20.2 C21.1 C22.1 C23.1 C24.1 C25.2 C26.1 C27.2 C28.1 C29.1 C30.1 C31.1 C32.1 C33.1 C34.1 C35.2 C36.1 C37.1 C38.2 C39.2 C40.1 C41.1 C42.1 C44.1 C46.1 C47.1 C49.1 C50.1 C51.1 C52.1 C53.2 C54.1 D1.2 D2.1 D3.1 D4.2 D8.1 D9.3 J1.A2 J1.A3 J1.A4 J1.A5 J1.A6 J1.A7 J1.A10 J1.A11 J1.A12 J1.B5 R3.1 R5.1 R6.1 R7.1 R10.1 R18.1 R19.1 R26.1 R29.1 R33.2 R36.1 R37.1 R39.2 R43.1 S1.1 S1.2 U1.16 U1.17 U2.7 U2.9 U4.2 U5.7 U5.17 U5.20 U5.29 U5.33 U5.47 U5.59 U5.72 U5.86 U5.87 U5.100 U6.2 U6.15 U7.2 U8.2 U9.2 U9.4 U9.5 | length 122.5
  Top Layer w0.2: v1(4.8,51.9) C3.1@6.18,51.9 6.1,51.82 v1(6.1,50.1) ; v1(5,56.6) 5.5,56.1 C6.2@5.5,55.3 ; v1(5.1,53.9) C4.1@6.48,53.9 ; v1@6.85,69.85 D1.2@8.7,69.85 v1@8.7,71.1 ; v1@7.125,61.675 U1.16@8.025,61.675 ; v1(8.6,42) 8.611,41.989 D8.1@8.611,41.15 ; v1(9.3,46.5) R33.2@10.5,46.5 ; R6.1@10.8,64.4 v1(10.8,65.5) ; v1(10.9,50.4) C5.1@10.9,51.48 ; R5.1@12.2,64.4 v1(12.2,65.5) ; C36.1@12.26,53.8 12.36,53.9 v1@13.213,53.9 ; v1(12.3,50.3) C10.1@12.3,51.48 ; v1(13.8,62.7) R3.1@13.8,63.8 ; R7.1@16.2,62 v1(17.3,62) ; v1(19,27.6) R37.1@20.3,27.6 ; v1(21.2,56.2) C1.2@21.2,58.9 ; v1(23.4,15.7) R36.1@23.4,16.7 ; v1@26.1,15.2 C52.1@27.1,15.2 ; v1(26.2,62.4) C12.1@26.2,63.6 ; v1@27.47,18.87 U9.5@28.776,18.87 v1@28.776,20.076 ; v1(28.1,62.3) C11.2@28.1,63.44 ; D2.1@28.4,65.86 28.76,65.5 29.3,65.5 v1(29.4,65.4) ; C35.2@29.6,62.06 v1(29.6,63) ; v1(32.4,49.8) 32.9,49.8 32.946,49.846 C29.1@33.7,49.846 ; v1(32.7,41.9) 33.6,42.8 C33.1@33.68,42.8 ; C30.1@33.94,47.1 v1@33.94,48.36 ; U9.2@34.2,16.33 37.43,16.33 37.6,16.5 U8.2@37.6,17.35 v1(37.6,18.9) ; U9.4@34.2,18.87 v1(34.2,19.9) ; v1(34.548,43.921) 35.126,44.499 U5.17@36.932,44.499 ; v1@34.6,43.7 35.1,43.7 35.801,42.999 U5.20@36.932,42.999 ; v1(34.9,39.1) R29.1@34.9,40 ; v1(35.212,48.778) 35.212,48.812 35.899,49.499 U5.7@36.932,49.499 ; U2.7@36.969,62.4 U2.7@36.789,62.22 38.52,62.22 v1(38.7,62.4) ; U7.2@37.45,21.3 v1(38.6,21.3) ; v1(37.8,54.3) 37.863,54.237 U5.100@38.67,54.237 ; v1(38.1,23.7) C49.1@39.24,23.7 ; v1(39.2,27) R26.1@39.2,28 ; C23.1@39.3,56.82 v1(39.3,57.9) ; v1@39.395,35.005 C40.1@39.395,36.125 ; C26.1@40.7,56.8 v1(40.7,57.9) ; v1@40.761,36.061 C44.1@40.761,37.045 40.17,37.636 U5.29@40.17,38.761 40.17,39.67 40.4,39.9 41.8,39.9 42.2,39.5 42.2,38.791 U5.33@42.17,38.761 42.17,38.03 42.5,37.7 43.7,37.7 43.9,37.5 43.9,36.997 C47.1@43.028,36.125 44.075,36.125 v1(44.1,36.1) ; C51.1@41.1,14.68 C51.1@41.02,14.6 41.02,15.92 v1(41.1,16) ; R10.1@41.6,60.8 v1(42.8,60.8) ; R39.2@42.5,18.9 v1@43.8,18.9 ; C13.2@43.2,64.6 v1(45.3,64.6) ; C22.1@44.5,57.06 v1@44.5,58.1 ; C50.1@44.82,15.1 44.92,15.2 v1(46.2,15.2) ; U5.87@45.17,54.237 U5.86@45.67,54.237 45.67,55.03 45.2,55.5 45.2,56.36 C24.1@45.9,57.06 45.8,57.16 v1(45.8,58.1) ; C28.1@49,57.38 C28.1@49.18,57.2 49.18,58.22 v1(49,58.4) ; U5.47@49.17,38.761 49.17,37.303 C41.1@49.225,37.248 49.225,36.775 v1(49.8,36.2) ; v1@52.34,19.14 C42.1@53.5,19.14 ; U5.59@52.408,44.499 53.301,44.499 54.42,43.38 C32.1@54.7,43.38 v1(54.7,42.4) ; U5.72@52.408,50.999 52.409,51 v1(53.9,51) ; v1(53.1,25.3) 53.3,25.5 R43.1@54.6,25.5 ; C31.1@55.516,46.64 v1(55.516,47.62) ; v1(55.94,15.34) C53.2@55.94,16.3 ; v1(56.8,17.8) C34.1@56.8,18.7 ; C37.1@57.2,28.42 v1(57.2,29.8) ; v1(58.5,28.4) 58.6,28.3 C46.1@58.6,26.86 ; v1(59.3,14) D9.3@59.3,15 ; C54.1@61.8,19.96 v1(61.8,20.9) ; v1(62.5,33.3) R18.1@63.6,33.3 ; C16.1@63.119,27.27 63.119,25.881 v1(63.2,25.8) ; C38.2@63.5,18.56 v1(63.5,19.6) ; v1@63.6,37.8 R19.1@64.7,37.8 ; C17.1@65.7,39.3 v1@65.7,40.7 ; D3.1@67.4,38.9 v1(67.4,40.3) ; v1@69.3,15.9 69.38,15.98 C20.2@69.38,16.6 C20.2@69.38,16.9 ; C18.1@70.3,20.54 72.315,20.54 72.6,20.825 U4.2@72.6,21.45 v1(72.6,22.5) ; D4.2@72.675,25.2 v1(74.2,25.2) ; C21.1@75.76,18.9 v1@76.6,18.9
  other v1: 26,15.2 69.3,15.6 43.718,18.875 27.3,18.9 76.893,18.944 52.4,19.1 28.8,20.1 42,23.3 44.8,23.3 42,24.4 44.8,24.4 46.1,30.5 48.7,30.6 48.7,31.5 46.1,31.6 32.5,35 33.5,35 39.4,35 40.8,36 32.4,37.5 33.5,37.5 63.5,37.7 65.718,40.675 33.9,48.4 13.243,53.865 20.7,57.6 21.8,57.6 44.492,58.12 20.6,60.3 21.7,60.3 7,61.7 6.8,69.8 8.742,71.206
  other v2: 9.2,57.7 10.3,57.7 11.4,57.7 9.2,58.8 10.3,58.8 11.4,58.8 9.2,59.9 10.3,59.9 11.4,59.9 33.477,60.51 34.677,60.51 33.477,61.585 34.677,61.585 33.477,62.66 34.677,62.66
  other v3: 56.9,22.65 58.1,22.65 55.7,23.2 59.3,23.2 56.9,23.75 58.05,23.75
IN0: R12.1 U5.19 | length 41.5
  Top Layer w0.2: U5.19@36.932,43.499 U5.19@36.932,43.499 v1(38.9,43.5) ; v1(51.9,32.6) 55.4,32.6 v1(55.9,33.1) ; R12.1@70.5,31.7 v1(71.8,31.7)
  Bottom Layer w0.2: v1(38.9,43.5) 41,43.5 v1(51.9,32.6) ; v1(55.9,33.1) 61.2,33.1 62.6,31.7 v1(71.8,31.7)
IN1: R13.1 U5.22 | length 32.2
  Top Layer w0.2: U5.22@36.932,41.999 U5.22@36.932,41.999 v1(38.9,42) ; v1(51.9,31.4) 55.7,31.4 v1(56.4,32.1) ; v1(61.6,29) 61.6,29.7 R13.1@62.2,30.3
  Bottom Layer w0.2: v1(38.9,42) 41.3,42 v1(51.9,31.4) ; v1(56.4,32.1) 58.5,32.1 v1(61.6,29)
INH: R43.2 U6.7 | length 1
  Top Layer w0.2: R43.2@54.6,24.5 55.4,24.5 U6.7@55.55,24.65
KGND: C43.1 C45.1 U5.15 Y1.2 Y1.4 | length 9.3
  Top Layer w0.2: C43.1@31.417,43.75 31.417,45.068 Y1.2@31.403,45.082 31.403,45.382 Y1.4@32.453,46.432 ; C45.1@32.309,47.687 32.309,46.576 Y1.4@32.453,46.432 ; U5.15@36.932,45.499 33.501,45.499 32.568,46.432 Y1.4@32.453,46.432
nERROR: R27.1 U5.82 | length 2
  Top Layer w0.2: U5.82@47.67,54.237 47.67,56.17 R27.1@47.7,56.2
NetC2_1: C2.1 U1.15 | length 2.1
  Top Layer w0.2: C2.1@7.94,63.5 8.675,62.765 U1.15@8.675,61.675
NetC2_2: C2.2 D1.1 L1.1 U1.13 U1.14 | length 12.1
  Top Layer w0.2: U1.13@9.975,61.675 U1.14@9.325,61.675 9.325,63.035 C2.2@8.86,63.5 8.86,65.39 D1.1@8.7,65.55 12.35,69.2 L1.1@12.35,71.4
NetC5_2: C5.2 R1.1 U1.4 | length 4.1
  Top Layer w0.2: U1.4@9.975,55.925 9.975,54.675 9.8,54.5 R1.1@9.8,53.9 9.8,53.5 C5.2@10.9,52.4
NetC7_1: C7.1 R3.2 | length 1.5
  Top Layer w0.2: R3.2@13.8,64.8 15.14,64.8 C7.1@15.24,64.9
NetC8_1: C8.1 C9.2 U1.8 | length 7.1
  Top Layer w0.2: U1.8@12.575,55.925 13.7,57.05 13.7,58.94 C9.2@13.8,59.04 14.74,58.1 15.8,58.1 16.16,58.46 C8.1@16.16,59
NetC8_2: C8.2 R4.1 | length 1.5
  Top Layer w0.2: R4.1@15.2,60.5 15.2,59.04 C8.2@15.24,59
NetC9_1: C9.1 R2.1 R4.2 R7.2 U1.9 | length 7.8
  Top Layer w0.2: U1.9@12.575,61.675 13.8,60.45 ; C9.1@13.8,59.96 13.8,60.45 ; R2.1@15.2,63.5 R7.2@15.2,62 ; R4.2@16.2,60.5 15.2,61.5 R7.2@15.2,62 ; 13.8,60.45 13.8,60.6 R7.2@15.2,62
NetC10_2: C10.2 U1.6 | length 7
  Top Layer w0.2: U1.6@11.275,55.925 11.275,55.225 11.8,54.7 13.6,54.7 13.9,54.4 13.9,52.9 13.4,52.4 C10.2@12.3,52.4
NetC13_1: C13.1 L2.2 | length 4.9
  Top Layer w0.2: L2.2@36.4,68.2 39.6,65 C13.1@39.6,64.6
NetC14_1: C14.1 C15.1 U2.4 | length 4.1
  Top Layer w0.2: U2.4@31.365,59.68 32.846,58.2 C14.1@33.44,58.2 C15.1@33.44,56.8
NetC14_2: C14.2 R8.1 R9.2 R10.2 U2.5 | length 8.2
  Top Layer w0.2: C14.2@34.36,58.2 R9.2@35.8,58.2 36.789,59.189 U2.5@36.789,59.68 38.68,59.68 R8.1@38.8,59.8 40.4,59.8 R10.2@41.6,59.8
NetC15_2: C15.2 R9.1 | length 1.6
  Top Layer w0.2: C15.2@34.36,56.8 35.4,56.8 R9.1@35.8,57.2
NetC18_2: C18.2 C19.1 R21.1 U4.3 | length 10.7
  Top Layer w0.2: v1(68.9,17.9) 68.6,18.2 R21.1@68.6,19.1 70.06,19.1 C19.1@70.3,18.86 ; v1(70.3,22.5) C18.2@70.3,21.46 70.31,21.45 U4.3@71.65,21.45
  Bottom Layer w0.2: v1(68.9,17.9) 68.9,21.1 v1(70.3,22.5)
NetC19_2: C19.2 C20.1 R22.1 U4.4 | length 6.9
  Top Layer w0.2: R22.1@68.6,20.6 68.9,20.6 69.8,19.7 70.9,19.7 U4.4@71.65,18.95 71.65,18.35 71.24,17.94 C19.2@70.3,17.94 C20.1@70.3,16.9
NetC35_1: C35.1 U2.3 | length 1.8
  Top Layer w0.2: C35.1@29.6,61.14 31.176,61.14 U2.3@31.365,60.95
NetC36_2: C36.2 U1.5 | length 2.4
  Top Layer w0.2: U1.5@10.625,55.925 10.7,55.85 10.7,54.44 C36.2@11.34,53.8
NetC38_1: C38.1 R31.1 R32.2 | length 2.5
  Top Layer w0.2: R31.1@62.14,17.7 R31.1@62.18,17.66 ; R32.2@62.18,16.5 R31.1@62.18,17.66 ; C38.1@63.5,17.64 62.2,17.64 R31.1@62.18,17.66
NetC42_2: C42.2 R28.1 R30.2 | length 2.8
  Top Layer w0.2: R28.1@53.5,21.4 C42.2@53.5,20.06 53.54,20.1 R30.2@54.9,20.1
NetC48_1: C48.1 D7.1 Q3.1 R37.2 | length 9.5
  Top Layer w0.2: Q3.1@17.76,32.045 21.3,28.505 R37.2@21.3,27.6 ; D7.1@21.5,26.155 21.3,26.355 R37.2@21.3,27.6 ; C48.1@23.28,27.7 23.18,27.6 R37.2@21.3,27.6
NetC48_2: C48.2 D6.3 D7.3 Q2.3 Q3.3 | length 16.3
  Top Layer w0.2: Q2.3@19.61,22.24 23.46,22.24 D6.3@24.2,21.5 24.2,24.9 D7.3@23.9,25.2 23.9,26.5 24.2,26.8 C48.2@24.2,27.7 23.4,28.5 23.4,31.485 Q3.3@22.84,32.045
NetD2_2: D2.2 D2.3 L2.1 U2.1 | length 8
  Top Layer w0.2: D2.2@28.4,67.915 28.685,68.2 L2.1@31.5,68.2 31.5,63.625 U2.1@31.365,63.49
NetD3_2: D3.2 R19.2 U3.4 | length 7.3
  Top Layer w0.2: R19.2@65.7,37.8 67.4,36.1 D3.2@67.4,35.6 66.7,34.9 66.7,31.55 U3.4@66.65,31.5
NetD5_2: D5.2 R23.1 | length 1.5
  Top Layer w0.2: D5.2@53.5,57 53.6,56.9 R23.1@53.6,55.5
NetD6_1: D6.1 Q2.1 R36.2 | length 5.5
  Top Layer w0.2: Q2.1@19.61,17.16 22.86,17.16 R36.2@23.4,17.7 23.245,17.855 D6.1@23.245,19.1
NetD8_3: D8.3 R34.1 R35.1 | length 3.4
  Top Layer w0.2: D8.3@11.1,40.2 11.5,40.2 12,39.7 R35.1@12.8,39.7 R34.1@12.8,38.2
NetF1_1: F1.1 U6.13 | length 2.5
  Top Layer w0.2: U6.13@58.8,21.75 58.8,21 59.5,20.3 F1.1@60.3,20.3
NetF1_4: F1.4 U6.12 | length 1.5
  Top Layer w0.2: U6.12@58.15,21.75 58.2,21.7 F1.4@58.2,20.3
NetQ1_1: Q1.1 Q4.3 R33.1 | length 4.1
  Top Layer w0.2: Q4.3@10.7,43.1 10.7,45.3 R33.1@10.5,45.5 11.95,45.5 Q1.1@12.05,45.6
NetQ1_2: Q1.2 Q3.2 Q4.2 R34.2 | length 13.3
  Top Layer w0.2: Q4.2@13.1,44.05 18.605,44.05 Q3.2@20.3,42.355 ; R34.2@13.8,38.2 15.3,38.2 v2(16.3,39.2) ; Q1.2@13.95,45.6 15.9,45.6 v2(16.3,45.2)
  other v2: 18.3,39.2 20.3,39.2 22.3,39.2 24.3,39.2 16.3,41.2 18.3,41.2 20.3,41.2 22.3,41.2 24.3,41.2 16.3,43.2 18.3,43.2 20.3,43.2 22.3,43.2 24.3,43.2 18.3,45.2 20.3,45.2 22.3,45.2 24.3,45.2
NetQ4_1: Q4.1 R35.2 | length 1.6
  Top Layer w0.2: R35.2@12.8,40.7 12.8,41.85 Q4.1@13.1,42.15
NetR5_2: R5.2 U1.10 | length 1.8
  Top Layer w0.2: U1.10@11.925,61.675 11.925,63.125 R5.2@12.2,63.4
NetR6_2: R6.2 U1.11 | length 1.9
  Top Layer w0.2: R6.2@10.8,63.4 11.275,62.925 U1.11@11.275,61.675
NetR11_2: R11.2 U3.2 | length 3.3
  Top Layer w0.2: U3.2@67.65,31.5 67.65,32.75 68.1,33.2 R11.2@69.5,33.2
NetR12_2: R12.2 U3.1 | length 1.4
  Top Layer w0.2: U3.1@68.15,31.5 69.3,31.5 R12.2@69.5,31.7
NetR13_2: R13.2 U3.8 | length 1.9
  Top Layer w0.2: R13.2@63.2,30.3 63.45,30.3 U3.8@64.65,31.5
NetR14_2: R14.2 U3.3 | length 4.3
  Top Layer w0.2: U3.3@67.15,31.5 67.15,33.95 67.9,34.7 R14.2@68.7,34.7
NetR15_2: R15.2 U3.5 | length 5.4
  Top Layer w0.2: R15.2@64.6,36.3 66.15,34.75 U3.5@66.15,31.5
NetR16_2: R16.2 U3.6 | length 3.7
  Top Layer w0.2: R16.2@64.6,34.8 65.65,33.75 U3.6@65.65,31.5
NetR17_2: R17.2 R18.2 U3.7 | length 3.9
  Top Layer w0.2: R17.2@63.6,31.8 63.6,32.3 R18.2@64.6,33.3 65.15,32.75 U3.7@65.15,31.5
NetR29_2: R29.2 U5.24 | length 2
  Top Layer w0.2: R29.2@34.9,41 R29.2@34.9,41 U5.24@36.932,40.999
NetR30_1: R30.1 U6.9 | length 3.4
  Top Layer w0.2: R30.1@54.9,19.1 55.3,19.1 55.9,19.7 55.9,20.1 56.2,20.4 U6.9@56.2,21.75
NetR38_1: R38.1 R41.2 U7.1 | length 6.7
  Top Layer w0.2: R41.2@35.7,21.2 36.75,22.25 U7.1@37.45,22.25 38.65,22.25 39.6,21.3 R38.1@41.6,21.3
NetR38_2: R38.2 R39.1 U7.4 | length 3.1
  Top Layer w0.2: U7.4@39.95,20.35 40,20.3 R38.2@41.6,20.3 41.5,20.2 R39.1@41.5,18.9
NetR40_1: R40.1 R42.2 U7.3 | length 6.9
  Top Layer w0.2: U7.3@37.45,20.35 38.15,20.35 41,17.5 R42.2@41,17.4 41.2,17.4 R40.1@42.5,16.1
NetR42_1: R42.1 U8.1 U8.4 | length 4.8
  Top Layer w0.2: U8.4@36.65,14.85 38.55,16.75 U8.1@38.55,17.35 39.95,17.35 R42.1@40,17.4
nFAULT: U5.5 U6.8 | length 42.5
  Top Layer w0.2: v1(54.7,21.8) 54.75,21.75 U6.8@55.55,21.75
  Bottom Layer w0.2: v1(35.4,51) 35.4,50.9 35.8,50.5 43.4,50.5 53.2,40.7 53.2,28.1 54.7,26.6 v1(54.7,21.8)
nRST: C28.2 D5.1 R24.1 S1.3 S1.4 U5.81 | length 15.8
  Top Layer w0.2: U5.81@48.17,54.237 48.17,55.17 50.1,57.1 C28.2@50.1,57.2 ; R24.1@50.1,58.6 C28.2@50.1,57.2 ; S1.3@52.5,65.5 S1.4@52.5,59 51.9,58.4 D5.1@51.9,57 50.3,57 C28.2@50.1,57.2
nSTB: U5.1 U6.14 | length 48
  Top Layer w0.2: U6.14@59.45,21.75 60.05,21.75 v1(60.6,22.3)
  Bottom Layer w0.2: v1(35.5,53.8) 36.7,52.6 43.3,52.6 54,41.9 54,32.6 55.4,31.2 56.8,31.2 60.6,27.4 v1(60.6,22.3)
NTC+: J1.A1 R41.1 U8.3 U9.3 | length 25.3
  Top Layer w0.2: J1.A1@24.255,2.43 31.9,10.075 31.9,16.3 33.2,17.6 U9.3@34.2,17.6 U8.3@36.4,17.6 ; R41.1@35.7,20.2 35.7,18.3 U8.3@36.4,17.6 ; U8.3@36.65,17.35 U8.3@36.4,17.6
nTRST: J1.B8 U5.76 | length 71.3
  Top Layer w0.2: U5.76@50.67,54.237 51.507,53.4 v1(53,53.4)
  Bottom Layer w0.2: v1(53,53.4) 64.2,53.4 77.2,40.4 77.2,19.344 77.393,19.152 77.393,18.737 77.2,18.545 77.2,4.525 J1.B8@75.105,2.43
OSCIN: C45.2 U5.14 Y1.1 | length 9.2
  Top Layer w0.2: Y1.1@31.403,46.432 31.403,47.673 C45.2@31.389,47.687 32.202,48.5 32.9,48.5 33.1,48.3 33.1,46.5 33.601,45.999 U5.14@36.932,45.999
OSCOUT: C43.2 U5.16 Y1.3 | length 5.9
  Top Layer w0.2: C43.2@32.337,43.75 32.453,43.866 Y1.3@32.453,45.082 32.536,44.999 U5.16@36.932,44.999
PUMP+: D4.1 R20.1 R21.2 U3.13 U3.14 U3.15 U3.16 | length 13.3
  Top Layer w0.2: U3.13@66.65,26.1 U3.14@67.15,26.1 U3.15@67.65,26.1 U3.16@68.15,26.1 69.05,25.2 D4.1@69.6,25.2 ; R21.2@67.6,19.1 66.6,19.1 65.9,19.8 65.9,22.1 66.9,23.1 R20.1@67.5,23.1 D4.1@69.6,25.2 ; D4.1@70.3,25.2 D4.1@69.6,25.2
PUMP_OUT: J1.B3 R20.2 R22.2 | length 15.1
  Top Layer w0.2: v1(66.6,20.8) 67.4,20.8 R22.2@67.6,20.6 67.6,22.3 67.5,22.2 R20.2@67.5,22.1
  Bottom Layer w0.2: v1(66.6,20.8) 66.7,20.8 66.705,20.795 J1.B3@66.705,8.78
RTCK: J1.B12 U5.80 | length 78.7
  Top Layer w0.2: v1(48,49.6) 48,52.4 48.67,53.07 U5.80@48.67,54.237
  Bottom Layer w0.2: v1(48,49.6) 61.1,49.6 73,37.7 73,28 71,26 71,15.2 68.9,13.1 68.9,8.8 65.2,5.1 60.975,5.1 J1.B12@58.305,2.43
RXD: U5.63 U6.4 | length 28.9
  Top Layer w0.2: U5.63@52.408,46.499 52.999,46.499 53.199,46.699 53.207,46.699 53.295,46.787 53.295,46.795 v1(54,47.5) ; v1(55.8,35.8) 55.8,35.1 57.9,33 57.9,26.8 57.5,26.4 U6.4@57.5,24.65
  Bottom Layer w0.2: v1(54,47.5) 54.9,46.6 56.6,46.6 56.907,46.293 56.907,36.3 56.407,35.8 v1(55.8,35.8)
SEL0: R15.1 U5.9 | length 32.2
  Top Layer w0.2: U5.9@36.932,48.499 38.901,48.499 v1(39,48.4) ; v1(52.45,39.85) v1(58,39.85) ; v1(61.8,35.9) 62.2,36.3 R15.1@63.6,36.3
  Bottom Layer w0.2: v1@39,48.5 43.8,48.5 v1(52.45,39.85) ; v1(58,39.85) 58,39.7 v1(61.8,35.9)
SEL1: R16.1 U5.10 | length 32.8
  Top Layer w0.2: U5.10@36.932,47.999 38.301,47.999 v1(39,47.3) ; v1(52.2,39) v1(57.8,39) ; v1(61.2,35.1) 61.5,34.8 R16.1@63.6,34.8
  Bottom Layer w0.2: v1(39,47.3) 39.5,47.8 43.4,47.8 v1(52.2,39) ; v1(57.8,39) 57.8,38.5 v1(61.2,35.1)
SEN: R14.1 U5.12 | length 41.7
  Top Layer w0.2: U5.12@36.932,46.999 38.101,46.999 38.6,46.5 v1(42.1,46.5) ; v1(52.1,34.7) 52.4,35 v1(54.6,35) ; R14.1@69.7,34.7 v1(70.9,34.7)
  Bottom Layer w0.2: v1(42.1,46.5) 52.1,36.5 v1(52.1,34.7) ; v1(54.6,35) 56.3,35 56.8,34.5 70.7,34.5 v1(70.9,34.7)
TCK: J1.B11 U5.79 | length 76
  Top Layer w0.2: v1(49,50.4) 48.8,50.6 48.8,52.553 49.15,52.903 49.17,52.923 U5.79@49.17,54.237
  Bottom Layer w0.2: v1(49,50.4) 62.6,50.4 74.2,38.8 74.2,27.3 71.9,25 71.9,15.3 69.655,13.055 69.655,8.455 65.4,4.2 64.275,4.2 J1.B11@62.505,2.43
TDI: J1.B9 U5.77 | length 72.8
  Top Layer w0.2: v1(50.141,52.541) 50.141,54.208 U5.77@50.17,54.237
  Bottom Layer w0.2: v1@50.141,52.559 v1(50.141,52.541) 63.959,52.541 76.1,40.4 76.1,20.8 73.6,18.3 73.6,5.125 J1.B9@70.905,2.43
TDO: J1.B10 U5.78 | length 74.9
  Top Layer w0.2: v1(49.6,51.6) 49.6,52.262 49.571,52.291 49.571,52.679 49.67,52.777 U5.78@49.67,54.237
  Bottom Layer w0.2: v1(49.6,51.6) 63.4,51.6 75.1,39.9 75.1,21.9 72.7,19.5 72.7,6.8 68.33,2.43 J1.B10@66.705,2.43
TMS: J1.B7 U5.75 | length 71.1
  Top Layer w0.2: U5.75@52.408,52.499 53.499,52.499 v1(55,54)
  Bottom Layer w0.2: v1(55,54) 65.7,54 77.7,42 77.7,4.035 J1.B7@79.305,2.43
TXD: U5.62 U6.1 | length 26.5
  Top Layer w0.2: U5.62@52.408,45.999 53.899,45.999 v1(54,46.1) ; v1(56.4,36.8) 56.4,35.2 60.8,30.8 60.8,26 U6.1@59.45,24.65
  Bottom Layer w0.2: v1(54,46.1) 56.4,43.7 v1(56.4,36.8)
VBAT: J1.A9 Q2.2 | length 11.9
  Top Layer w0.35: Q2.2@9.3,19.7 11.655,17.345 J1.A9@11.655,8.78
  other v2: 6.455,15.7 8.455,15.7 10.455,15.7 12.455,15.7 6.455,17.7 8.455,17.7 10.455,17.7 12.455,17.7 6.455,19.7 8.455,19.7 10.455,19.7 12.455,19.7 6.455,21.7 8.455,21.7 10.455,21.7 12.455,21.7 6.455,23.7 8.455,23.7 10.455,23.7 12.455,23.7
pads on no net: D6.2 D7.2 D8.2 J1.A8 J1.B4 J1.B6 J1.MH1 U1.7 U1.12 U2.2 U2.6 U3.9 U3.10 U3.11 U3.12 U5.3 U5.4 U5.11 U5.18 U5.23 U5.25 U5.26 U5.27 U5.31 U5.34 U5.35 U5.36 U5.37 U5.38 U5.39 U5.40 U5.41 U5.42 U5.43 U5.44 U5.45 U5.51 U5.52 U5.53 U5.54 U5.55 U5.56 U5.57 U5.58 U5.64 U5.65 U5.66 U5.67 U5.68 U5.69 U5.70 U5.71 U5.73 U5.74 U5.83 U5.84 U5.89 U5.90 U5.91 U5.92 U5.93 U5.94 U5.95 U5.97 U5.98 U6.11 U9.1 U9.8
copper on no net:
  other v1: -4.4,56.1

## Polygon pours and split planes (outlines as drawn)
GND on Bottom Layer "NONET_L-01_P-001" (solid, remove dead copper, pour order 1): 0.3,-0.228 82.85,-0.228 82.85,95.228 76.706,101.372 6.444,101.372 0.3,95.228
GND on Top Layer "NONET_L-01_P-001" (solid, remove dead copper, pour order 0): 0.2,-0.2 82.75,-0.2 82.75,95.256 76.606,101.4 6.344,101.4 0.2,95.256
GND on GND (split plane): 82.04,95.245 82.04,0.51 0.51,0.51 0.51,95.245 6.355,101.09 76.195,101.09
1V2 on POWER (split plane): 56.171,49.046 56.171,40.154 50.146,34.129 45.2,34.129 45.15,34.12 45.108,34.092 43.608,32.592 43.58,32.55 43.571,32.5 43.571,27.654 43.346,27.429 35.254,27.429 34.429,28.254 34.429,54.546 36.254,56.371 48.846,56.371
12V on POWER (split plane): 12.471,13 12.48,12.95 12.508,12.908 12.55,12.88 12.6,12.871 47.1,12.871 47.15,12.88 47.192,12.908 47.22,12.95 47.229,13 47.229,25.371 62.3,25.371 62.35,25.38 62.392,25.408 62.42,25.45 62.429,25.5 62.429,26.3 62.429,29.171 68.071,29.171 68.071,14.925 68.05,14.929 49.6,14.929 49.55,14.92 49.508,14.892 49.48,14.85 49.471,14.8 49.471,11.929 8.229,11.929 8.229,15.7 8.229,50.546 8.254,50.571 12.471,50.571
5V on POWER (split plane): 82.04,95.245 82.04,42.929 63.8,42.929 63.75,42.92 63.708,42.892 62.208,41.392 62.18,41.35 62.171,41.3 62.171,29.3 62.171,26.3 62.171,25.654 62.146,25.629 59.254,25.629 59.029,25.854 59.029,65.6 59.02,65.65 58.992,65.692 58.95,65.72 58.9,65.729 42.3,65.729 42.25,65.72 42.208,65.692 31.346,54.829 0.51,54.829 0.51,95.245 6.355,101.09 76.195,101.09
3V3 on POWER (split plane): 58.771,25.8 58.78,25.75 58.808,25.708 58.887,25.629 47.1,25.629 47.05,25.62 47.008,25.592 46.98,25.55 46.971,25.5 46.971,13.129 12.729,13.129 12.729,50.7 12.72,50.75 12.692,50.792 12.65,50.82 12.6,50.829 8.2,50.829 8.15,50.82 8.108,50.792 8.008,50.692 7.98,50.65 7.971,50.6 7.971,15.7 7.971,11.8 7.98,11.75 8.008,11.708 8.05,11.68 8.1,11.671 49.6,11.671 49.65,11.68 49.692,11.708 49.72,11.75 49.729,11.8 49.729,14.671 68.05,14.671 68.1,14.68 68.125,14.697 68.15,14.68 68.2,14.671 68.25,14.68 68.292,14.708 68.32,14.75 68.329,14.8 68.329,29.3 68.32,29.35 68.292,29.392 68.25,29.42 68.2,29.429 62.429,29.429 62.429,41.246 63.854,42.671 82.04,42.671 82.04,0.51 0.51,0.51 0.51,54.571 31.4,54.571 31.45,54.58 31.492,54.608 42.354,65.471 58.771,65.471

## Keep-outs
Keep-Out Layer:
  rectangle: 40.275,91.6 42.275,101.6
  rectangle: 52.553,0 82.553,12
  rectangle: 0,0 30,12
  rectangle: 35.275,-0.09 47.275,8.91
  rectangle: 0.003,98.6 82.553,101.6
  rectangle: 78.557,0 82.557,101.6
  rectangle: 0,0 4,101.6

## Other copper
POWER (plane layer: these items are gaps in the copper):
  lines w0.254: -0.1,54.7 31.4,54.7 42.3,65.6 58.9,65.6 58.9,25.8 59.2,25.5 62.3,25.5 62.3,26.3 62.3,41.3 63.8,42.8 82.4,42.8 ; 68.05,14.8 49.6,14.8 49.6,11.8 8.1,11.8 8.1,15.7 8.1,50.6 8.2,50.7 12.6,50.7 12.6,13 14.1,13 47.1,13 47.1,25.5 51.6,25.5 62.2,25.5 62.3,25.6 62.3,29.3 68.2,29.3 68.2,14.8 ; 34.3,28.2 34.3,54.6 36.2,56.5 37.6,56.5 48.9,56.5 56.3,49.1 56.3,40.1 50.2,34 45.2,34 43.7,32.5 43.7,27.6 43.4,27.3 35.2,27.3 34.3,28.2

## Silkscreen, mask and mechanical layers (free items; w line width, h text height)
Mechanical 1:
  lines w0.254: 0,0 0.127,0
Board Outline:
  lines w0.254: 76.396,101.6 6.515,101.6 6.144,101.6 0,95.456 0,0 82.55,0 82.55,95.456 76.406,101.6